# Altium PCB SIM.A7682S.PcbDoc
Units mm, origin at the board's own origin, x right, y up, seen from the top; angles counter-clockwise.
Board outline 66.82 x 84.33 mm, 2 copper layers (Top Layer, Bottom Layer); 45 components, 42 nets, 216 pads, 0 vias.
Unrouted connection lines stored in the file: 115.
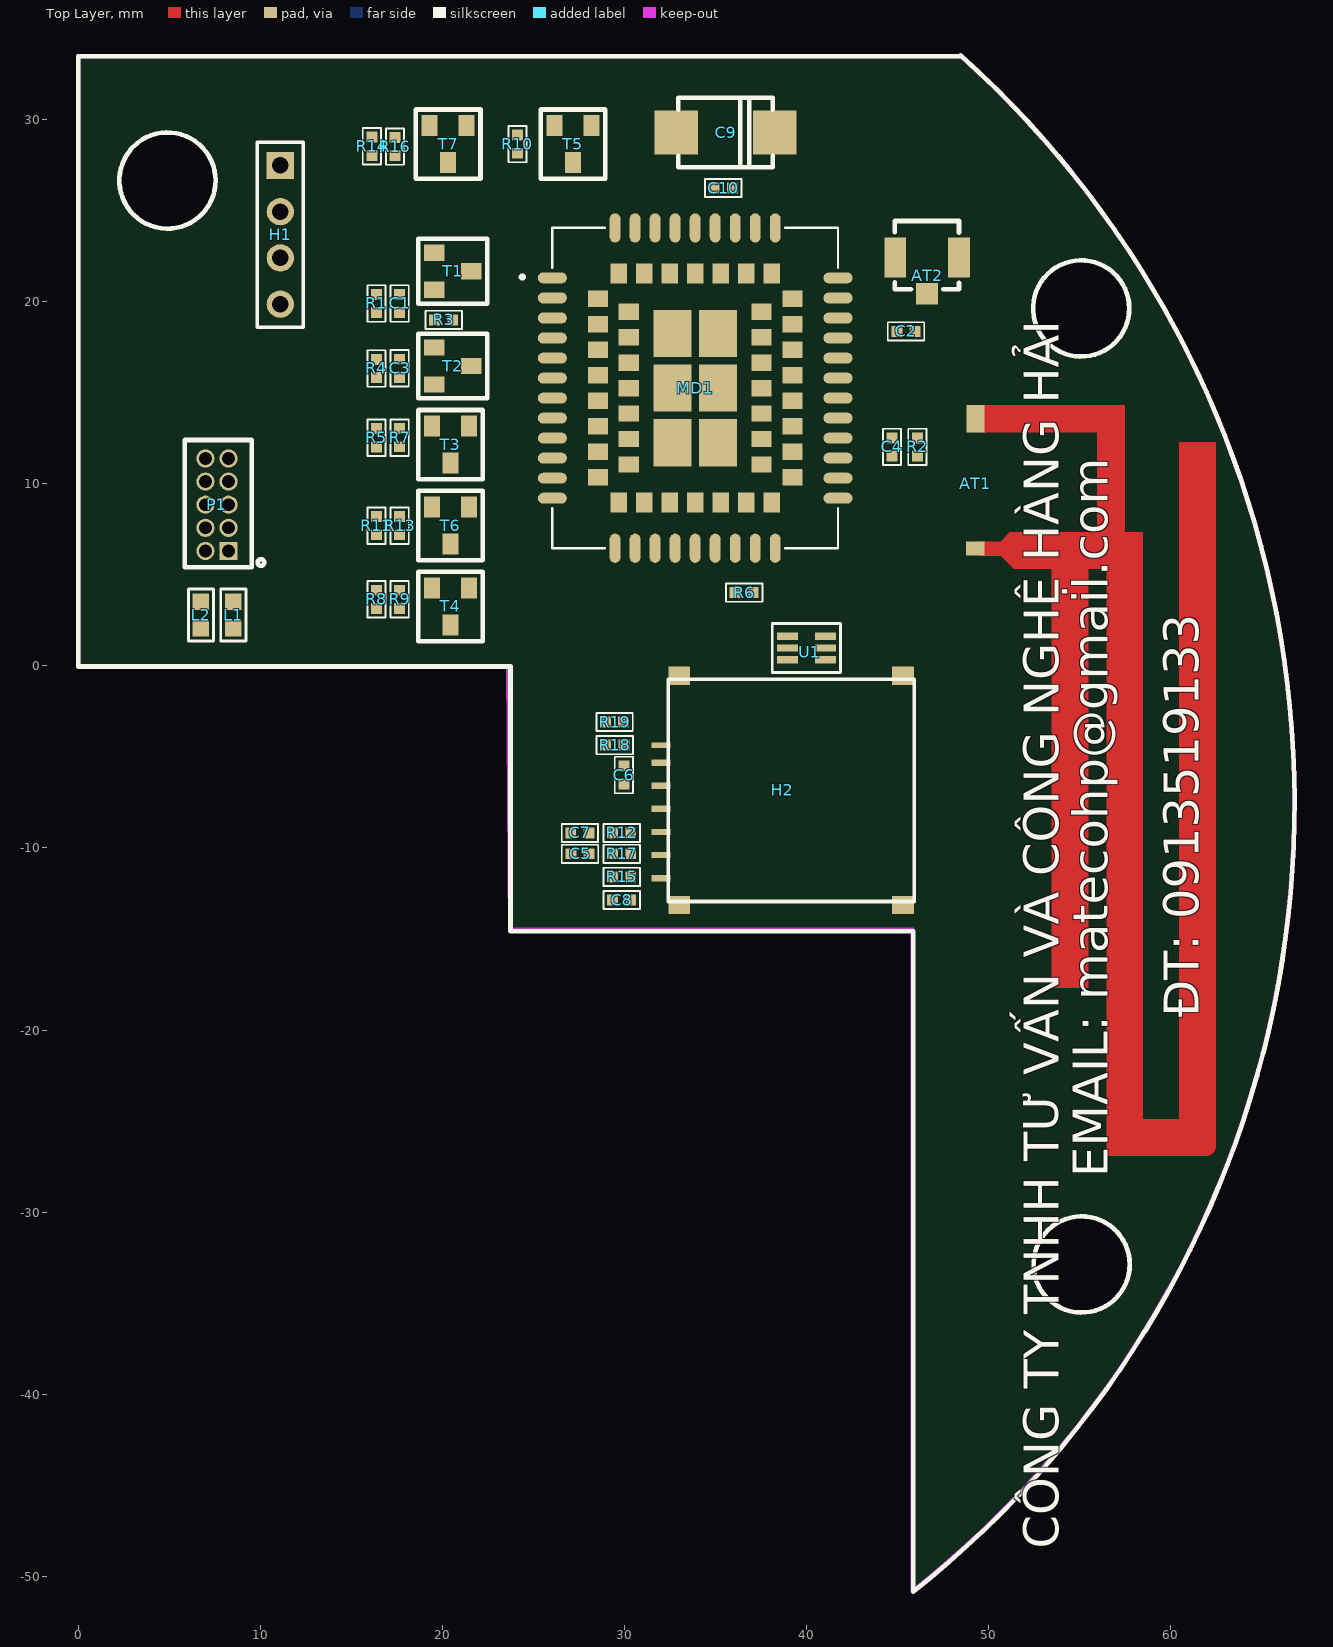
[diagram p0: Top Layer view]
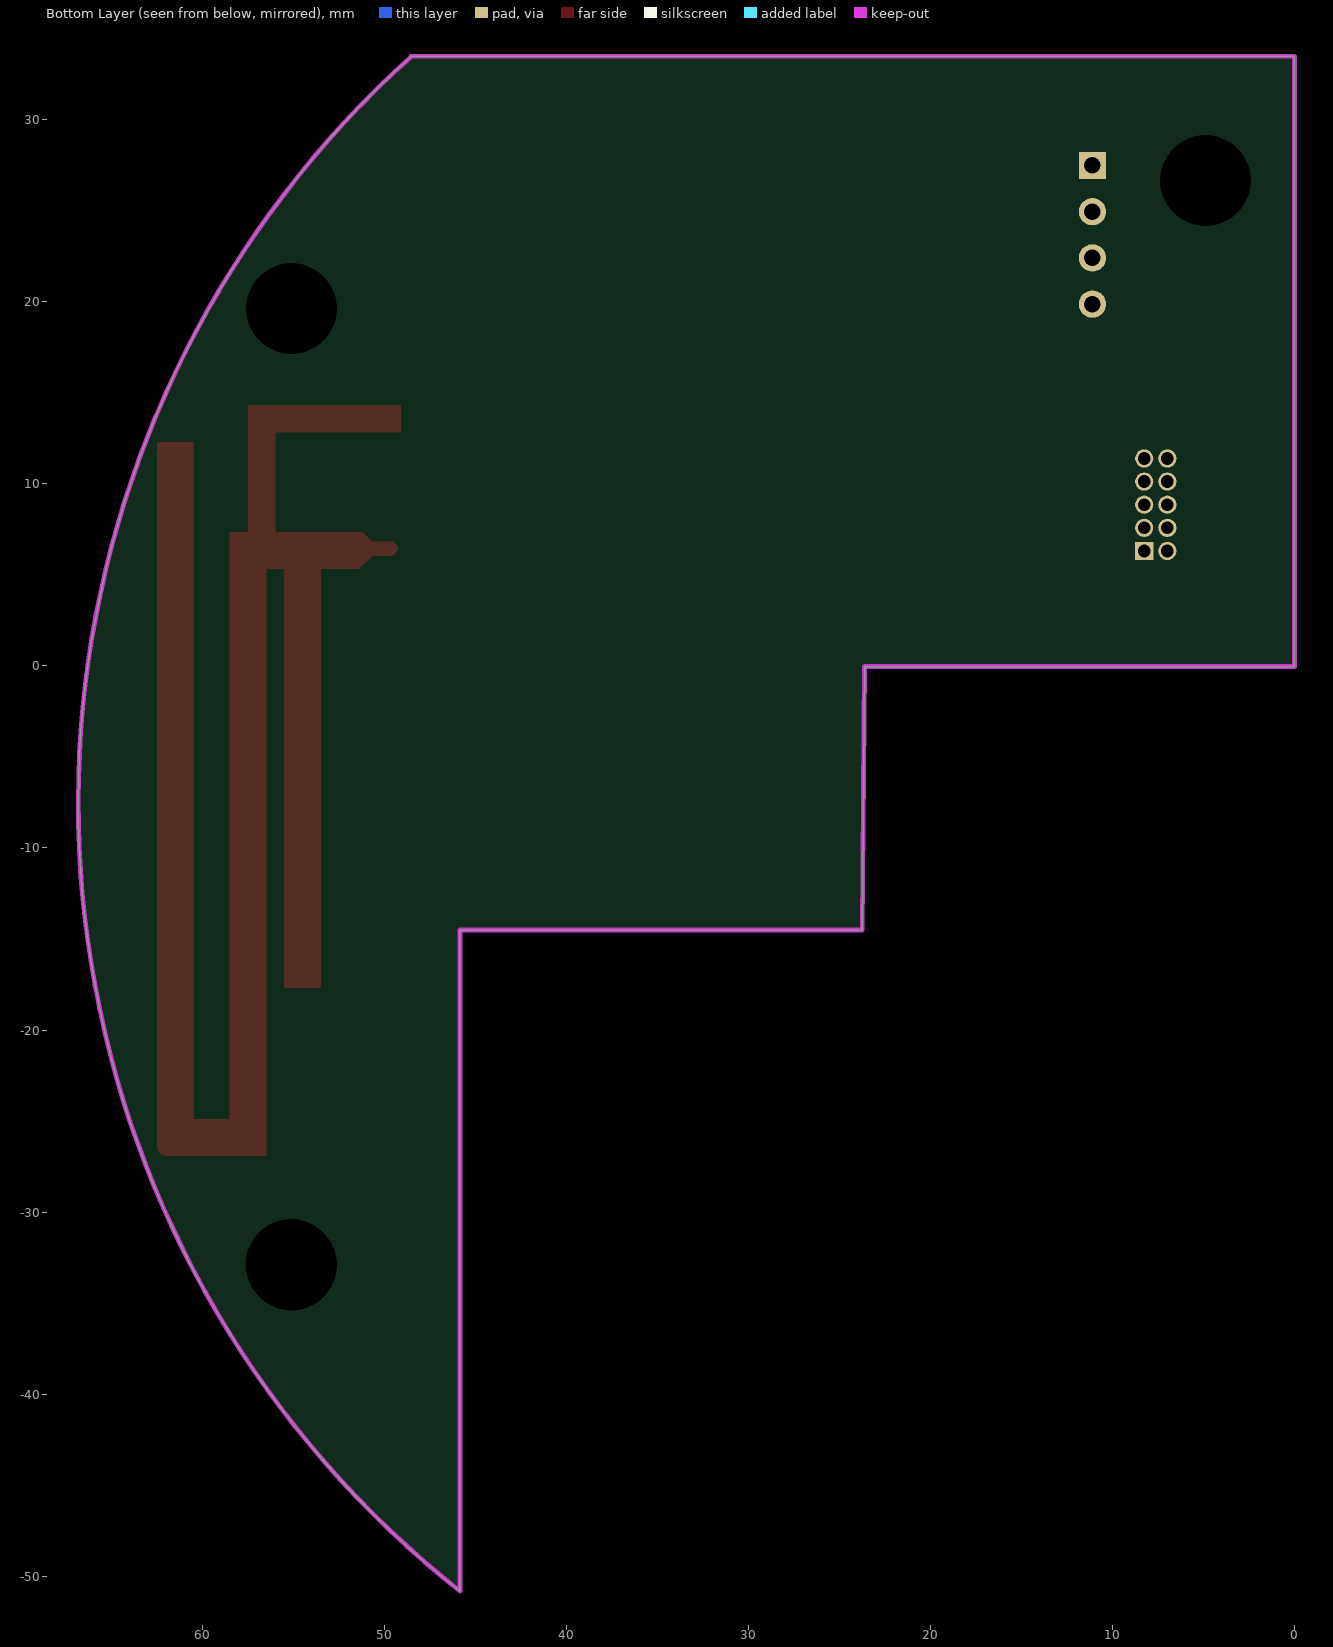
[diagram p1: Bottom Layer view, seen from below]

## Layer stack, top to bottom
Top Solder: solder mask 0.0102, Solder Resist, Dk 3.5
Top Layer: signal copper 0.0356
Dielectric 1: dielectric 0.32, FR-4, Dk 4.8
Bottom Layer: signal copper 0.0356
Bottom Solder: solder mask 0.0102, Solder Resist, Dk 3.5

## Board outline
0,-0.031 23.622,-0.031 23.749,-14.509 45.847,-14.509 45.847,-50.831 ccw(c11.66,-7.543) 48.56,33.456 48.56,33.497 0,33.497

## Design rules (kind name [scope] priority, off if disabled: settings)
Clearance [All] p1: gap=0.254 ignorepadtopadclearanceinfootprint=FALSE except(0: Arc-Hole Track-Hole SMDPad-Hole THPad-Hole Via-Hole Fill-Hole Poly-Hole Region-Hole Text-Hole)
PolygonConnect [All] p1: connectstyle=Relief reliefconductorwidth=0.254 reliefentries=4 polygonreliefangle="90 Angle" airgapwidth=0.254
RoomDefinition SIM.A7682S [InComponentClass('SIM.A7682S')] p1: confinementstyle=ConfineIn formatcopy=TRUE lockcomponents=FALSE outline 153.289,-20.351 400.431,-20.351 400.431,23.845 153.289,23.845
RoomDefinition SIM.A7682.CONECTER [InComponentClass('SIM.A7682.CONECTER')] p2: confinementstyle=ConfineIn formatcopy=TRUE lockcomponents=FALSE outline 153.289,-50.958 157.734,-50.958 157.734,-21.494 153.289,-21.494
RoutingVias [All] p1: holewidth=0.711 width=1.27 viastyle="Through Hole" minholewidth=0.711 minwidth=1.27 maxholewidth=0.711 maxwidth=1.27
SolderMaskExpansion [All] p1: expansion=0.102 istentingtop=FALSE
Width [All] p1: maxlimit=0.254 minlimit=0.254 preferedwidth=0.254
30 further rules are at their usual default settings.

## Components (designator, comment, footprint, x,y, rotation, side; value= is the part's Value field where it differs from the comment)
AT1 "LTE Antenna" "Antenna LTE/4G PCB" 49.276,6.446 r0 top
AT2 "IPEX SMD" "IPEX SMD" 46.637,20.448 r270 top value="IPEX SMA"
C1 "102/50V" CAP_CERAMIC_0402(1005) 17.653,19.916 r270 top
C2 "100pF/50V" CAP_CERAMIC_0402(1005) 45.474,18.384 r0 top
C3 "102/50V" CAP_CERAMIC_0402(1005) 17.653,16.352 r270 top
C4 "104/50V" CAP_CERAMIC_0402(1005) 44.704,12.034 r270 top
C5 "20pF/50V" CAP_CERAMIC_0402(1005) 27.567,-10.318 r180 top
C6 "104/50V" CAP_CERAMIC_0402(1005) 29.972,-5.992 r270 top
C7 "20pF/50V" CAP_CERAMIC_0402(1005) 27.559,-9.175 r180 top
C8 "20pF/50V" CAP_CERAMIC_0402(1005) 29.853,-12.858 r0 top
C9 "106/10V" CAP_TANTAL_2312(6032-28) 35.56,29.306 r180 top
C10 "104/50V" CAP_CERAMIC_0402(1005) 35.433,26.258 r0 top
H1 "NC" HDR1X4 11.1,27.5 r270 top
H2 "SimSocket" MUP-C7801 32.42,-12.939 r90 top value="6 Pin"
L1 "4A/23Ohm" RES_0603(1608) 8.509,2.8 r270 top
L2 "4A/23Ohm" RES_0603(1608) 6.731,2.8 r270 top
MD1 "SIM A7682S LNXV" "SIM A7682S" 26.043,21.318 r0 top
P1 "HX PZ1.27-2x5P ZZ" "HX PZ1.27-2x5P ZZ" 7.62,8.859 r90 top
R1 "4.7K" RES_0402(1005) 16.383,19.916 r270 top
R2 "NC" RES_0402(1005) 46.101,12.034 r90 top value=0R
R3 "4.7K" RES_0402(1005) 20.074,19.019 r0 top
R4 "4.7K" RES_0402(1005) 16.383,16.344 r270 top
R5 "1K" RES_0402(1005) 16.383,12.542 r270 top
R6 "NC" RES_0402(1005) 36.584,4.033 r0 top
R7 "10K" RES_0402(1005) 17.653,12.542 r90 top
R8 "1K" RES_0402(1005) 16.383,3.66 r270 top
R9 "10K" RES_0402(1005) 17.653,3.66 r90 top
R10 "10K" RES_0402(1005) 24.13,28.671 r270 top
R11 "1K" RES_0402(1005) 16.383,7.708 r270 top
R12 "0R" RES_0402(1005) 29.853,-9.175 r0 top
R13 "10K" RES_0402(1005) 17.653,7.708 r90 top
R14 "1K" RES_0402(1005) 16.129,28.552 r270 top
R15 "0R" RES_0402(1005) 29.853,-11.588 r0 top
R16 "10K" RES_0402(1005) 17.399,28.536 r90 top
R17 "0R" RES_0402(1005) 29.853,-10.318 r0 top
R18 "0R" RES_0402(1005) 29.472,-4.349 r0 top
R19 "4.7K" RES_0402(1005) 29.464,-3.079 r0 top
T1 "C1815" SOT23-3 19.558,20.67 r270 top
T2 "C1815" SOT23-3 19.558,15.463 r270 top
T3 "C1815" SOT23-3 19.431,13.177 r180 top
T4 "AO3400" SOT23-3 19.431,4.287 r180 top
T5 "AO3415" SOT23-3 26.162,29.687 r180 top
T6 "AO3400" SOT23-3 19.431,8.732 r180 top
T7 "AO3400" SOT23-3 19.304,29.687 r180 top value="30V 4A"
U1 "SMF05CT2G" SOT65P210X140-6N 40.005,0.985 r180 top

## Footprints (in the part's own frame and the unit in brackets; to place one, negate y for a bottom-side part, rotate by r counter-clockwise, add the part's x,y. Pads: shape width x height; smd on the part's side, far side on the other; paste and mask are expansions set on the pad)
"Antenna LTE/4G PCB" [mm]
  rect 1x0.77 smd paste+0 mask+0: 1(0,0)
  rect 1x1.5 smd paste+0 mask+0: 2(0.026,7.138)
  Top Layer region: 0.254,-0.38 1.397,-0.38 2.131,-1.114 4.216,-1.114 4.216,-24.126 6.215,-24.126 6.215,-1.114 7.216,-1.114 7.216,-33.362 12.67,-33.362 12.778,-33.362 12.979,-33.278 13.132,-33.125 13.216,-32.924 13.216,-32.816 13.216,-32.816 13.216,5.843 11.214,5.843 11.214,-31.36 9.215,-31.36 9.215,0.888 8.217,0.888 8.217,7.885 -0.178,7.885 -0.178,6.387 6.713,6.387 6.713,0.888 1.902,0.888 1.4,0.385 0.257,0.385 0,0.128 0,-0.128
CAP_CERAMIC_0402(1005) [mm]
  rect 0.6x0.6 smd: 1(-0.5,0) 2(0.5,0)
  silkscreen extent -1,-0.5 1,0.5, body extent -0.5,-0.25 0.5,0.25, height 0.5
CAP_TANTAL_2312(6032-28) [mm]
  rect 2.4x2.4 smd: 1(-2.7,0) 2(2.7,0)
  silkscreen extent -2.6,-1.91 2.6,1.91, body extent -3.09,-1.6 3.09,1.6, height 2.69
HDR1X4 [mm] "Connector; Header; 4 Position"
  rect 1.5x1.5 hole 0.9: 1(0,0)
  round 1.5 hole 0.9: 2(2.54,0) 3(5.08,0) 4(7.62,0)
  silkscreen extent -1.27,-1.27 8.89,1.27
"HX PZ1.27-2x5P ZZ" [mm] "HX PZ1.27-2x5P ZZ"
  rect 1x1 hole 0.7: 1(-2.54,-0.635)
  round 1 hole 0.7: 2(-2.54,0.635) 3(-1.27,-0.635) 4(-1.27,0.635) 5(0,-0.635) 6(0,0.635) 7(1.27,-0.635) 8(1.27,0.635) 9(2.54,-0.635) 10(2.54,0.635)
  silkscreen extent -3.43,-2.59 3.56,1.78, body extent -3.17,-1.75 3.17,1.65, height 2.5
"IPEX SMD" [mm]
  rect 1.2x1.2 smd: 1(0,0)
  rect 2.2x1.2 smd: 2(-2,1.75) 2(-2,-1.75)
  silkscreen extent -4,-1.78 -0.25,1.75, body extent -3.55,-1.5 -0.45,1.5, height 1.25
MUP-C7801 [mm]
  rect 0.35x1.04 smd: 1(6.36,0.4) 2(3.82,0.4) 3(1.28,0.4) 5(7.63,0.4) 6(5.09,0.4) 7(2.55,0.4)
  rect 1x1.2 smd: 5(-0.2,-0.6) 5(-0.2,-12.9) 5(12.4,-0.6) 5(12.4,-12.9)
  rect 0.3x1.04 smd: 8(8.58,0.4)
  silkscreen extent 0,-13.5 12.2,0, body extent 0.57,-13.75 11.79,0.6, height 1.25
RES_0402(1005) [mm]
  rect 0.6x0.6 smd: 1(-0.5,0) 2(0.5,0)
  silkscreen extent -1,-0.5 1,0.5, body extent -0.5,-0.25 0.5,0.25, height 0.35
RES_0603(1608) [mm] "Chip Inductor, Body 0.6x0.3mm, IPC High Density"
  rect 0.9x0.9 smd: 1(-0.725,0) 2(0.725,0)
  silkscreen extent -1.43,-0.67 1.43,0.7, body extent -0.77,-0.42 0.78,0.43, height 0.45
"SIM A7682S" [mm]
  oval 1.6x0.6 smd: 1(0,0) 2(0,-1.1) 3(0,-2.2) 4(0,-3.3) 5(0,-4.4) 6(0,-5.5) 7(0,-6.6) 8(0,-7.7) 9(0,-8.8) 10(0,-9.9) 11(0,-11) 12(0,-12.1) 22(15.7,-12.1) 23(15.7,-11) 24(15.7,-9.9) 25(15.7,-8.8) 26(15.7,-7.7) 27(15.7,-6.6) 28(15.7,-5.5) 29(15.7,-4.4) 30(15.7,-3.3) 31(15.7,-2.2) 32(15.7,-1.1) 33(15.7,0)
  oval 0.6x1.6 smd: 13(3.45,-14.85) 14(4.55,-14.85) 15(5.65,-14.85) 16(6.75,-14.85) 17(7.85,-14.85) 18(8.95,-14.85) 19(10.05,-14.85) 20(11.15,-14.85) 21(12.25,-14.85) 34(12.25,2.75) 35(11.15,2.75) 36(10.05,2.75) 37(8.95,2.75) 38(7.85,2.75) 39(6.75,2.75) 40(5.65,2.75) 41(4.55,2.75) 42(3.45,2.75)
  rect 1.1x0.9 smd: 43(2.5,-1.15) 44(2.5,-2.55) 45(2.5,-3.95) 46(2.5,-5.35) 47(2.5,-6.75) 48(2.5,-8.15) 49(2.5,-9.55) 50(2.5,-10.95) 58(13.2,-10.95) 59(13.2,-9.55) 60(13.2,-8.15) 61(13.2,-6.75) 62(13.2,-5.35) 63(13.2,-3.95) 64(13.2,-2.55) 65(13.2,-1.15) 73(4.2,-1.85) 74(4.2,-3.25) 75(4.2,-4.65) 76(4.2,-6.05) 77(4.2,-7.45) 78(4.2,-8.85) 79(4.2,-10.25) 80(11.5,-10.25) 81(11.5,-8.85) 82(11.5,-7.45) 83(11.5,-6.05) 84(11.5,-4.65) 85(11.5,-3.25) 86(11.5,-1.85)
  rect 0.9x1.1 smd: 51(3.65,-12.35) 52(5.05,-12.35) 53(6.45,-12.35) 54(7.85,-12.35) 55(9.25,-12.35) 56(10.65,-12.35) 57(12.05,-12.35) 66(12.05,0.25) 67(10.65,0.25) 68(9.25,0.25) 69(7.85,0.25) 70(6.45,0.25) 71(5.05,0.25) 72(3.65,0.25)
  rect 2.1x2.6 smd: 87(6.6,-3.05) 88(6.6,-6.05) 89(6.6,-9.05) 90(9.1,-9.05) 91(9.1,-6.05) 92(9.1,-3.05)
  silkscreen extent -1.75,-14.85 15.7,2.75, body extent -0.05,-14.88 15.65,2.72, height 2.6
SOT23-3 [mil]
  rect 35x45 smd: 1(0,0) 2(-40,80) 3(-80,0)
  silkscreen extent -110,-35 30,115
SOT65P210X140-6N [mm]
  round 0.4 on Top Overlay: 0(-1.4,1.1)
  rect 1.15x0.4 smd: 1(-1.05,0.65) 2(-1.05,0) 3(-1.05,-0.65) 4(1.05,-0.65) 5(1.05,0) 6(1.05,0.65)
  silkscreen extent -1.88,-1.35 1.88,1.35, body extent -1.13,-1 1.13,1, height 1

## Part data
AT1: library part "Antenna GSM/LTE PCB", MPN=NC
AT2: library part SNW_H11-L17-SMA, "CONN RCPT IPEX 50Ω SMD", MFR=Fieyuxin, MPN=U.FL-R-SMT-1(80), Solder=HAND
C1 C3: library part Cap, "CAP CER 1nF 50V X7R 0402", MFR=YAGEO, MPN=CC0402KRX7R9BB102, Category="Ceramic Capacitors", LatestRevisionDate=17-Jul-2002, LatestRevisionNote="Re-released for DXP Platform.", PackageReference=RAD-0.3, Published=8-Jun-2000, Publisher="Altium Limited"
C2: library part CC0402FRNPO9BN101, "CAP CER 100pF 50V NP0 0402", MFR=YAGEO, MPN=CC0402JRNPO9BN101, Category="Ceramic Capacitors"
C4: library part C0603C102K5RACTU, "CAP CER 100nF 50V X5R 0402", MFR=YAGEO, MPN=CC0402KRX5R9BB104, Category="Ceramic Capacitors", CompanyID=VT-00573, Solder=SMT
C5 C7 C8: library part 0603N330J500CT, "CAP CER 20pF 50V NP0 0402", MFR="Vishay Vitramon", MPN=CQ0402FRNPO9BN200, Category="Ceramic Capacitors", CompanyID=VT-01106, Solder=SMT
C6: library part C0603C104K5RACTU, "CAP CER 100nF 50V X5R 0402", MFR="Vishay Vitramon", MPN=CC0402KRX5R9BB104, Category="Ceramic Capacitors", CompanyID=VT-00982, Solder=SMT
C9: library part "Cap Tantal 2312 (6032-28)", "CAP TANT 10uF ±10% 16V CASE-C-6032", MPN=TAJC106K016RNJ
C10: library part CC0402KRX5R9BB104, "CAP CER 100nF 50V X5R 0402", MFR=YAGEO, Category="Ceramic Capacitors", MPN=CC0402KRX5R9BB104
H1: library part USB-A/RAF, MPN=NC
H2: library part MUP-C7801, "Nano Sim card Socket", MFR=OEM, MPN=MUP-C7801-2
L1 L2: library part FBMJ1608HM230NTV, "FERRITE BEAD 23Ω 0603 1LN", MFR="Taiyo Yuden", MPN=FBMJ1608HM230NT, Category="Ferrite Beads and Chips"
MD1: library part "SIM A7682S", "SIMCOM A7682S LNXV No GPS", MFR=SIMCOM, MPN="SIM A7682S LNXV"
P1: "Pin1.27mmpitch 2*5PStraight Pin Dual row vertical DIP Mating female header：HX PM1.27-2x5Pseries Black6TMaterial...", Color=Black, Current Rating=2A, Dielectric Material=Polyamide, Insulation Resistance=5GΩ, Manufacturer=hanxia, Max Operating Temperature=105°C, Min Operating Temperature=-40°C, Category="Card Edge Connectors", China RoHS=Compliant, ComponentLink1Description=https://datasheet.octopart.com:443/929974-01-10-RK-3M-datasheet-24569739.pdf?src-supplier=IHS, ComponentLink1URL=https://datasheet.octopart.com:443/929974-01-10-RK-3M-datasheet-24569739.pdf?src-supplier=IHS, ComponentLink2Description=https://datasheet.octopart.com:443/80000909525-3M-datasheet-5391050.pdf?src-supplier=Arrow+Electronics, ComponentLink2URL=https://datasheet.octopart.com:443/80000909525-3M-datasheet-5391050.pdf?src-supplier=Arrow+Electronics, ComponentLink3Description=http://sigma.octopart.com:80/conflict_mineral_statement/3M-company-24.pdf?src-supplier=Compliance+Statements, ComponentLink3URL=http://sigma.octopart.com:80/conflict_mineral_statement/3M-company-24.pdf?src-supplier=Compliance+Statements, ComponentLink4Description="New link", Connector Type="Forked, Receptacle", Contact Gender=Female, Contact Plating=Tin, Depth=1.27, Export Control Classification Number (ECCN) Code=EAR99, Gender=Female, Harmonized Tariff Schedule (HTS) Code=8536.69.40.40, Height=8.26mm, Housing Color=Black, Insulation Color=Black, Introduction Date=2007-03-15, Lead Free="Lead Free", Lifecycle Status=Production, Manufacturer Part Number="HX PZ1.27-2x5P ZZ", Max Current Rating=2A, Mount="Through Hole", MPN="HX PZ1.27-2x5P ZZ", Number of Contacts=5, Number of Positions=10, Number of Rows=2, Orientation=Straight, Packaging=Bulk, Pitch=1.27, Pricing 1="1=2, 10=1.79, 50=1.79, 100=1.7, 1000=1.22, 10000=1.18 (USD)", REACH SVHC=Unaffected, RoHS=Compliant, Stock 1=1610, Supplier 1=Mouser, Terminal Pitch=1.27mm, Termination=Solder
R1 R3 R4: library part Res1, "RES 4.7kΩ ±1% 62.5mW 0402", MFR="Vishay Dale", MPN=RC0402FR-074K7L, Category="Chip Resistor - Surface Mount", LatestRevisionDate=17-Jul-2002, LatestRevisionNote="Re-released for DXP Platform.", PackageDescription="Axial Device, Thru-Hole; 2 Leads; 0.3 in Pin Spacing", PackageReference=AXIAL-0.3, Published=8-Jun-2000, Publisher="Altium Limited"
R2: library part Res1, "Trở 10K 1/8W 1% 0603", MFR=YAGEO, MPN=RT0603DRD0710KL, Category="Chip Resistor - Surface Mount", LatestRevisionDate=17-Jul-2002, LatestRevisionNote="Re-released for DXP Platform.", PackageDescription="Axial Device, Thru-Hole; 2 Leads; 0.3 in Pin Spacing", PackageReference=AXIAL-0.3, Published=8-Jun-2000, Publisher="Altium Limited", Value1=NC
R5 R8 R11 R14: library part RC0402JR-074K7P, "RES 1kΩ ±5% 62.5mW 0402", MFR=YAGEO, MPN=RC0402JR-071KL, Category="Chip Resistor - Surface Mount"
R6: library part RT0603BRD071KL, MFR=YAGEO, MPN=RC0402FR-131KL, Category="Chip Resistor - Surface Mount"
R7 R9 R10 R13 R16: library part RC0402JR-074K7P, "RES 10kΩ ±5% 62.5mW 0402", MFR=YAGEO, MPN=RC0402JR-0710KL, Category="Chip Resistor - Surface Mount"
R12 R15 R17: library part RC0402FR-131KL, "RES 0Ω ±1% 62.5mW 0402", MFR=YAGEO, MPN=RC0402FR-070RL, Category="Chip Resistor - Surface Mount"
R18: library part RC0402FR-070RL, "RES 0 OHM JUMPER 1/16W 0402", MFR=YAGEO, Category="Chip Resistor - Surface Mount", MPN=RC0402FR-070RL
R19: library part RC0402JR-074K7P, "RES SMD 4.7K OHM 5% 1/16W 0402", MFR=YAGEO, Category="Chip Resistor - Surface Mount", MPN=RC0402JR-074K7P
T1 T2: library part C18C5, "Trans C1815 NPN 0.15A/50V SMD SOT-23", MFR=LinhKienChatLuong, MPN=2SC1815, Category="Transistor NPN"
T3: library part 2SC1815-HF, "Trans C1815 NPN 0.15A/50V SMD SOT23", MFR=LinhKienChatLuong, MPN=2SC1815, Parameter 2="Transistor NPN"
T4 T6 T7: library part 2N7002,215, "MOSFET N-CH 30V 4A SOT-23", MFR="Discrete Semiconductor Products", Category="Mosfet N-Channel", MPN=AO3400
T5: library part A03415, "MOSFET N-CH 20V 4A SOT-23", Category="Transistor PNP", MPN=AO3415
U1: library part SMF05C, "Diode Zener 6-TSSOP", MFR="ON SEMICONDUCTOR", Category=IC, CompanyID=VT-0, ComponentLink1Description=http://www.onsemi.com/pub/Collateral/SMF05C-D.PDF, ComponentLink1URL=http://www.onsemi.com/pub/Collateral/SMF05C-D.PDF, MPN=SMF05CT2G, Solder=SMT

## Free pads (board coordinates)
  round 0 hole 5: 0(4.9,26.669) 0(55.1,-32.9) 0(55.1,19.644) 0(55.125,-32.881)

## Nets (pads, with @x,y where several pads share a name; then routed paths per layer and width w, separated by ;. In a path a pad name is that pad's centre, name@x,y a point inside that pad or via, vN(x,y) a via of type N, cw(c..) or ccw(c..) an arc to the next point about the centre after c; other vN are vias at no path point)
1.8V: C1.2 C3.1 MD1.40 R1.2 R3.1 R4.1 R19.2
3.9V: L1.1 P1.1
GND: L2.1 P1.2
GSM.DTR: MD1.6 T3.3
GSM.GND: AT1.2 AT2.2 C4.1 C5.2 C6.1 C7.2 C8.2 C9.2 C10.1 H1.4 H2.5 L2.2 MD1.8 MD1.13 MD1.19 MD1.21 MD1.27 MD1.30 MD1.31 MD1.33 MD1.36 MD1.37 MD1.45 MD1.67 MD1.70 MD1.71 MD1.87 MD1.88 MD1.89 MD1.90 MD1.91 MD1.92 R6.1 R7.1 R9.1 R13.1 R16.1 T3.2 T4.2 T6.2 T7.2 U1.2
GSM.PWR: L1.2 R10.2 T5.2
GSM.PWRKEY: MD1.39 T4.3
GSM.RST: MD1.29 T6.3
GSM.RXD: MD1.2 R3.2 T2.3
GSM.TXD: MD1.1 T1.2
NetAT1_1: AT1.1 R2.1
NetAT2_1: AT2.1 C2.2 R2.2
NetC1_1: C1.1 R1.1 T1.1
NetC2_1: C2.1 MD1.32
NetC3_2: C3.2 R4.2 T2.1
NetH2_2: H2.2 R12.2 U1.4
NetH2_3: H2.3 R15.2 U1.6
NetH2_7: H2.7 R17.2 U1.5
NetH2_8: H2.8 R18.2
NetMD1_7: MD1.7 P1.6
NetMD1_42: MD1.42 P1.7
NetP1_3: P1.3 T2.2
NetP1_4: P1.4 R5.2
NetP1_5: P1.5 T1.3
NetP1_8: P1.8 R8.2
NetP1_9: P1.9 R11.2
NetP1_10: P1.10 R14.2
NetR5_1: R5.1 R7.2 T3.1
NetR8_1: R8.1 R9.2 T4.1
NetR10_1: R10.1 T5.1 T7.3
NetR11_1: R11.1 R13.2 T6.1
NetR14_1: R14.1 R16.2 T7.1
SIM.CLK: C8.1 MD1.16 R15.1
SIM.DATA: C5.1 MD1.15 R17.1
SIM.DET: MD1.14 R18.1 R19.1
SIM.RST: C7.1 MD1.17 R12.1
SIM.VDD: C6.2 H2.1 MD1.18 U1.3
USB.BOOT: MD1.20 R6.2
USB.VCC: C4.2 H1.1 MD1.24
USB_N: H1.2 MD1.26
USB_P: H1.3 MD1.25
VBAT: C9.1 C10.2 MD1.34 MD1.35 T5.3
pads on no net: H2.6 MD1.3 MD1.4 MD1.5 MD1.9 MD1.10 MD1.11 MD1.12 MD1.22 MD1.23 MD1.28 MD1.38 MD1.41 MD1.43 MD1.44 MD1.46 MD1.47 MD1.48 MD1.49 MD1.50 MD1.51 MD1.52 MD1.53 MD1.54 MD1.55 MD1.56 MD1.57 MD1.58 MD1.59 MD1.60 MD1.61 MD1.62 MD1.63 MD1.64 MD1.65 MD1.66 MD1.68 MD1.69 MD1.72 MD1.73 MD1.74 MD1.75 MD1.76 MD1.77 MD1.78 MD1.79 MD1.80 MD1.81 MD1.82 MD1.83 MD1.84 MD1.85 MD1.86 U1.0 U1.1

## Keep-outs
Keep-Out Layer:
  lines w0.254: 48.56,33.456 cw(c11.66,-7.543) 45.847,-50.831 45.847,-14.509 23.749,-14.509 23.622,-0.031 0,-0.031 0,33.497 48.56,33.497

## Silkscreen, mask and mechanical layers (free items; w line width, h text height)
Top Overlay:
  circle w0.254: c55.1,19.644 r2.644
  circle w0.254: c55.125,-32.881 r2.644
  circle w0.254: c4.9,26.669 r2.644
  lines w0.254: 48.425,33.494 29.65,33.494 28.45,33.494 0,33.494 0,-0.031 23.75,-0.031 23.75,-14.581 45.875,-14.581 45.875,-50.862 ccw(c11.605,-7.563) 48.472,33.546
  text "ĐT: 0913519133" at 62.2,-19.3 h3.3 r90
  text "EMAIL: matecohp@gmail.com" at 57.2,-28.1 h3.3 r90
  text "CÔNG TY TNHH TƯ VẤN VÀ CÔNG NGHỆ HÀNG HẢI" at 54.5,-48.5 h3.3 r90